# Altium PCB Relay Board.PcbDoc
Units mil, origin at the board's own origin, x right, y up, seen from the top; angles counter-clockwise.
Board outline 8250 x 5750 mil, 2 copper layers (Top, Bottom Layer), stack 92.212 mil thick; 12 components, 19 nets, 62 pads, 34 vias.
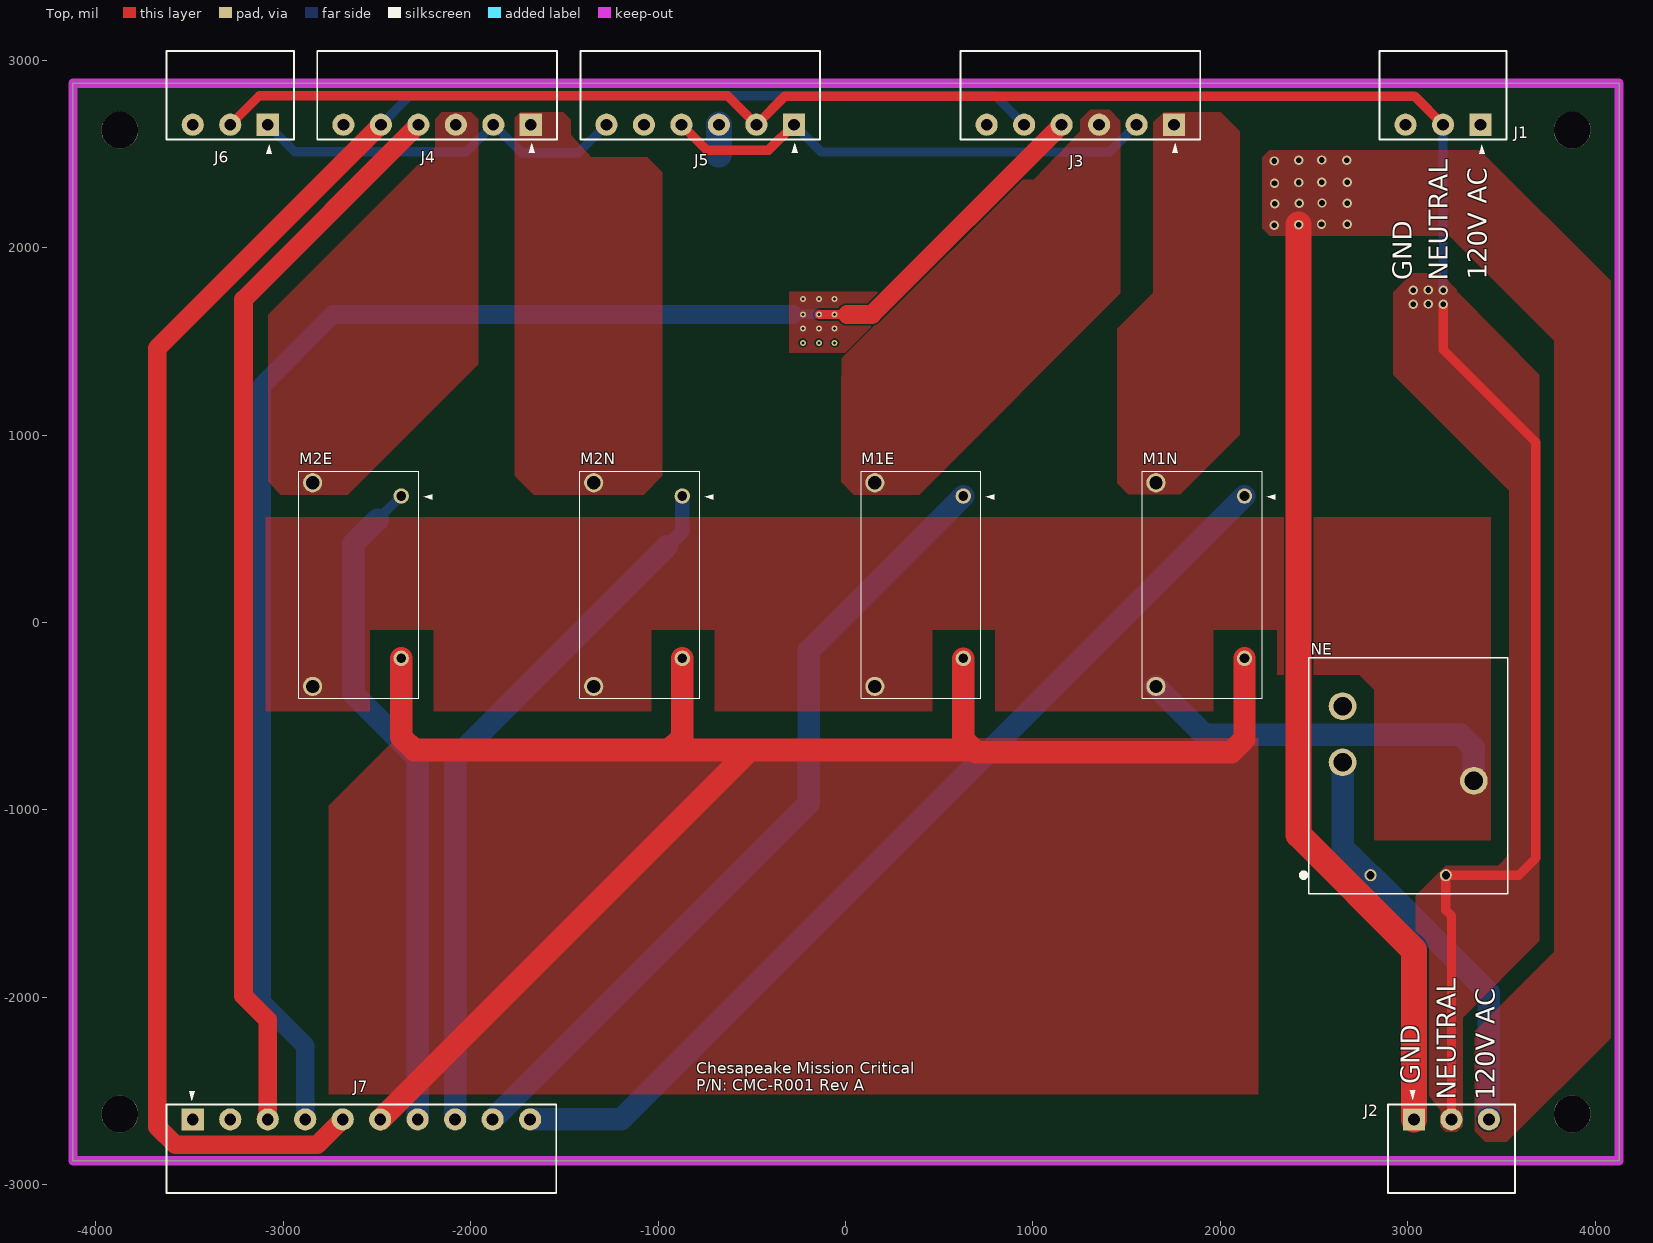
[diagram p0: Top view]
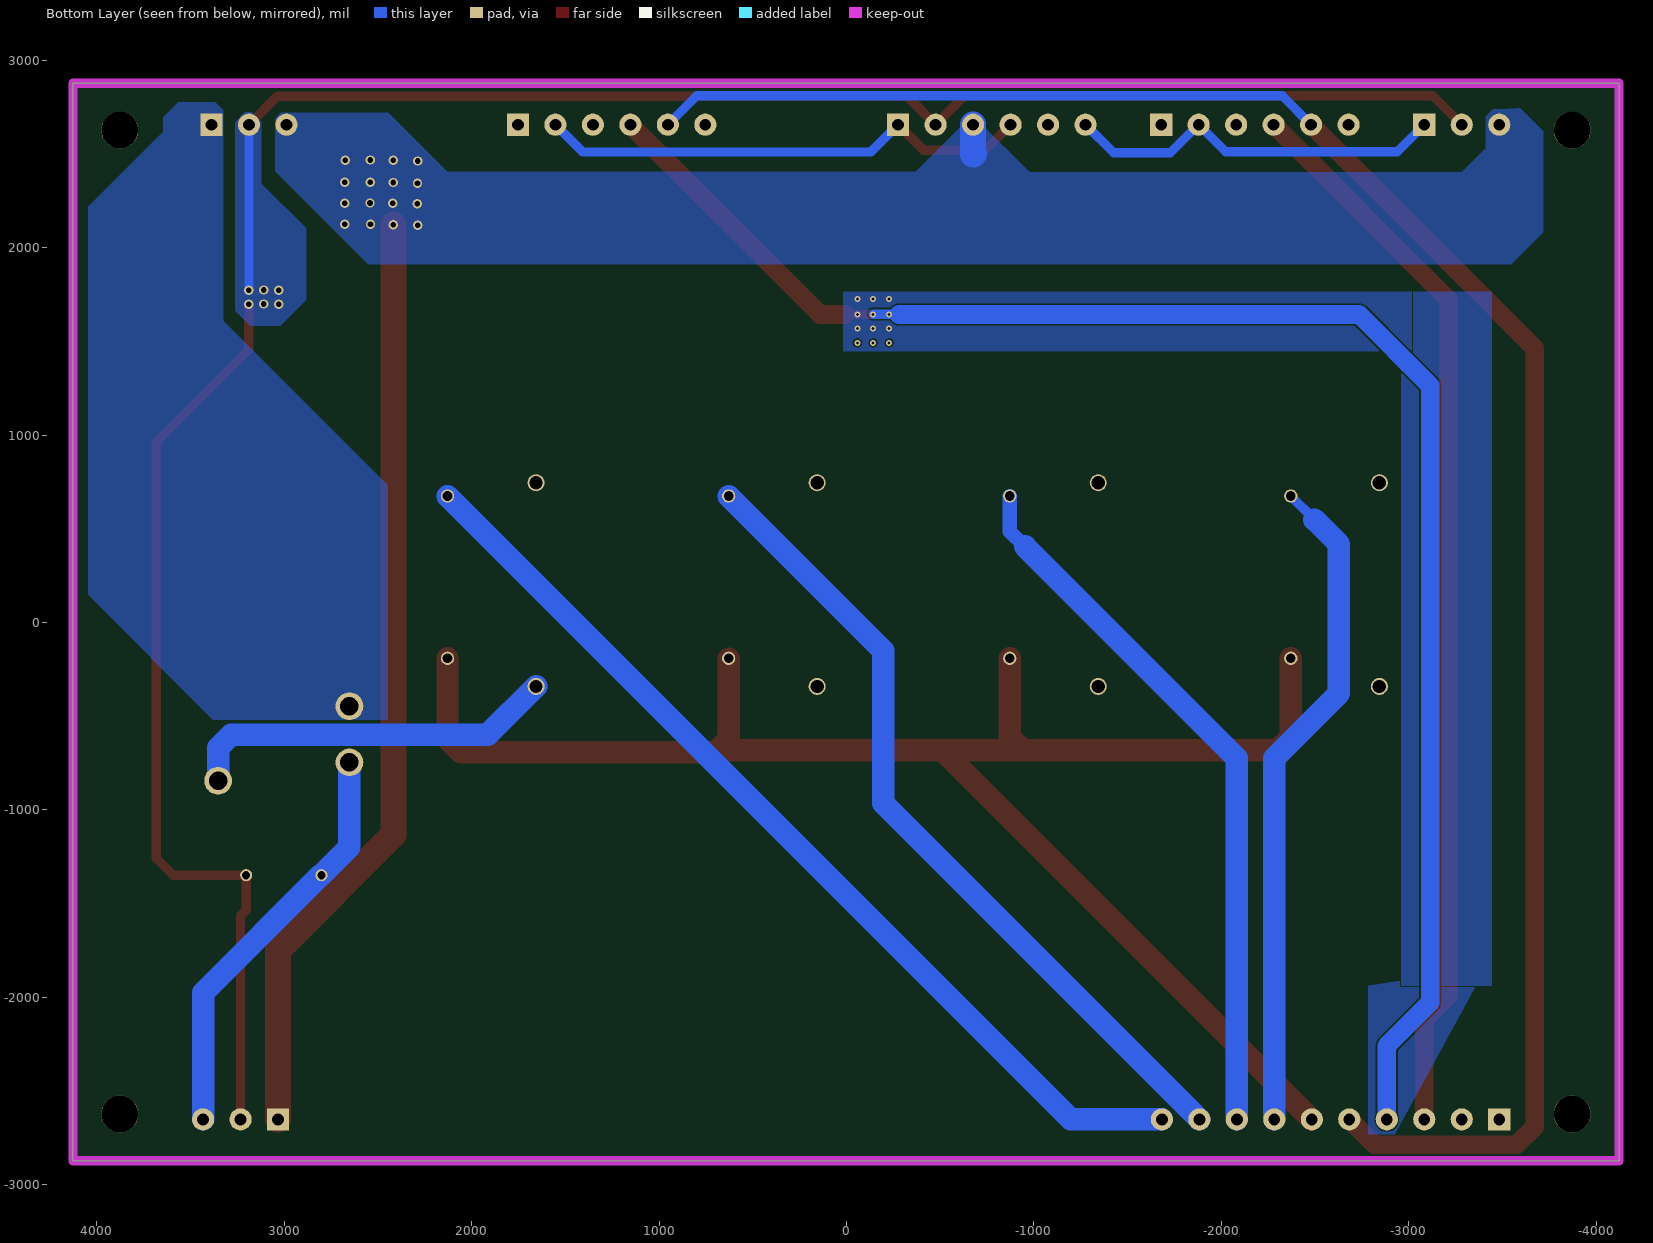
[diagram p1: Bottom Layer view, seen from below]
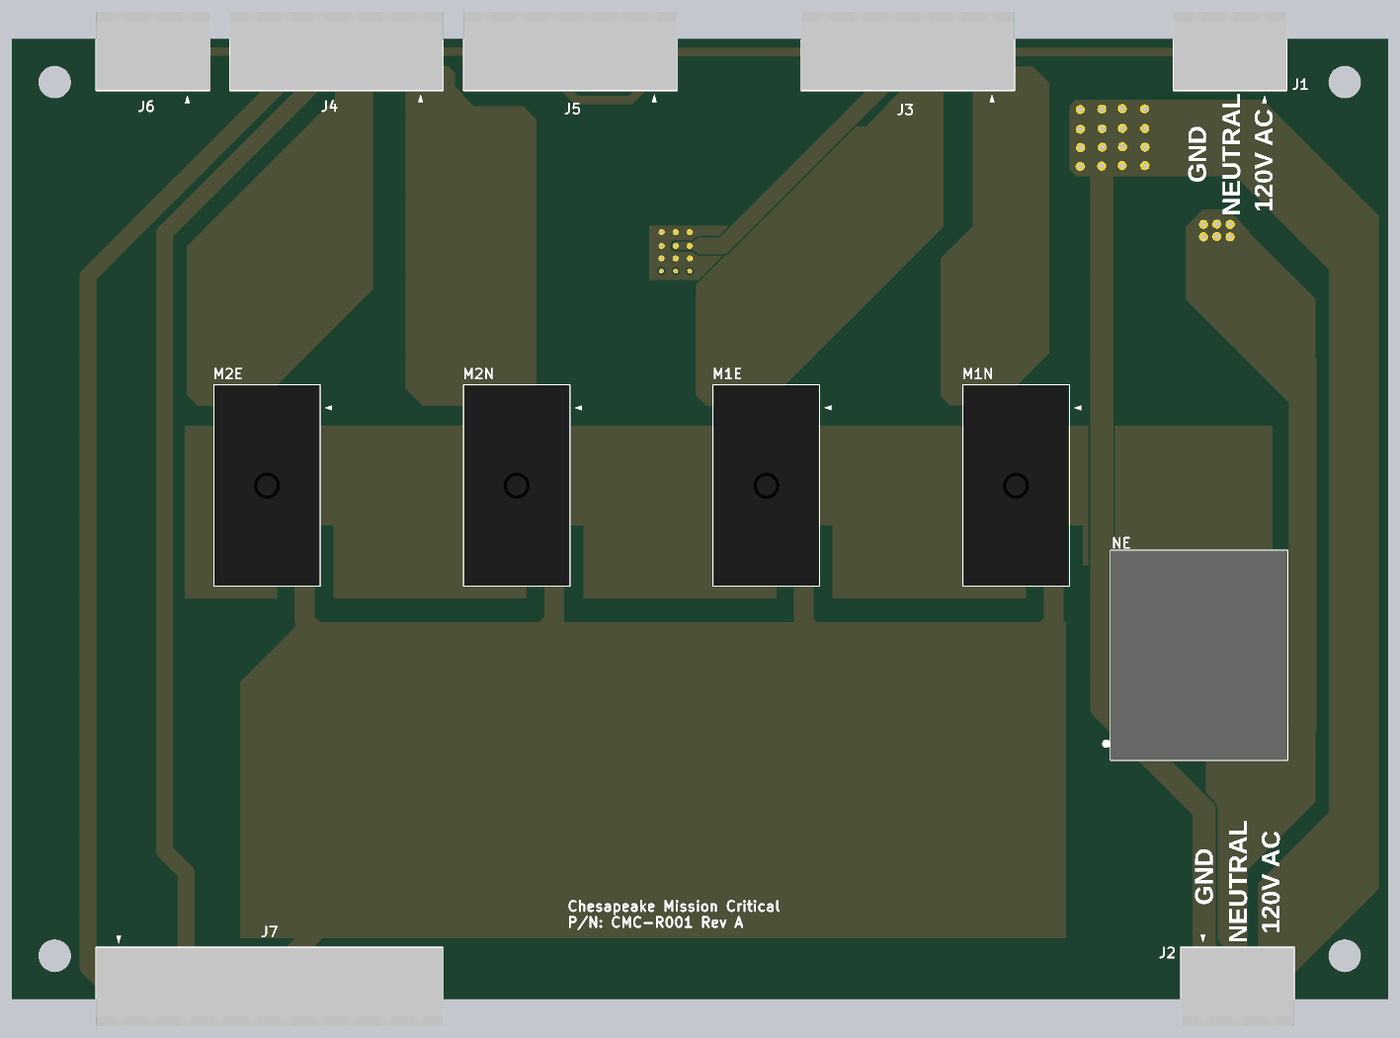
[diagram p2: 3D render of the assembled board from above, using the file's embedded part models]

## Layer stack, top to bottom
Solder Mask Top: solder mask 0.394, Solder Resist, Dk 3.5
Top: signal copper 4.1339
Dielectric: dielectric 83.944, FR-4, Dk 4.2
Bottom Layer: signal copper 4.1339
Bottom Solder: solder mask 0.394, Solder Resist, Dk 3.5

## Board outline
-4122.24,-2872.32 -4122.24,-2434.82 -4122.24,-2457.32 -4122.24,2442.68 -4122.24,2440.18 -4122.24,2877.68 4127.76,2877.68 4127.76,2440.18 4127.76,-1937.32 4127.76,-2872.32

## Design rules (kind name [scope] priority, off if disabled: settings)
Clearance Clearance_Default [All] p1: gap=8 ignorepadtopadclearanceinfootprint=FALSE except(10: Track-Poly)
ComponentClearance "ComponentClearance - Default - DEFAULT" [All] p1: gap=0 collisioncheckmode=3 verticalgap=10 showdistances=FALSE
FanoutControl Fanout_SOIC [IsSOIC] p1: bgadir=Out bgaviamode=Centered fanoutstyle=Auto fanoutdirection=Alternating viagrid=1 // Fanout_SOIC (Default Rule)
FanoutControl Fanout_Small [(CompPinCount < 5)] p2: bgadir=Out bgaviamode=Centered fanoutstyle=Auto fanoutdirection=OutThenIn viagrid=1 // Fanout_Small (Default Rule)
FanoutControl Fanout_LCC [IsLCC] p3: bgadir=Out bgaviamode=Centered fanoutstyle=Auto fanoutdirection=Alternating viagrid=1 // Fanout_LCC (Default Rule)
FanoutControl Fanout_BGA [IsBGA] p4: bgadir=Out bgaviamode=Centered fanoutstyle=Auto fanoutdirection=Alternating viagrid=1 // Fanout_BGA (Default Rule)
Height [All] p1: minheight=0 maxheight=1181.1 prefheight=500
HoleSize [All] p1: absolutevalues=TRUE maxlimit=200 minlimit=1 maxpercent=80.000 minpercent=20.000
HoleToHoleClearance "HoleToHoleClearance - Default - DEFAULT" [All] p1: gap=12 allowstackedmicrovias=TRUE
Length "Default Length" [All] p1: maxlimit=50000 minlimit=0
MaxMinImpedance "Default Impedance" [All] p1: minimum=50.00 maximum=150.0
MinimumSolderMaskSliver [All] p1: minsoldermaskwidth=5
ParallelSegment "Default Parallel Segment Adjasent" [All] p1 off: limit=1000 gap=200
ParallelSegment "Default Parallel Segment Same Layer" [All] p2 off: limit=1000 gap=200
PlaneConnect "Default PlaneConnect" [All] p1: planeconnectstyle=Direct reliefexpansion=20 reliefentries=4 reliefconductorwidth=15 reliefairgap=10
PolygonConnect [All] p1: thpad.connectstyle=Direct thpad.reliefconductorwidth=10 thpad.reliefentries=4 thpad.polygonreliefangle="90 Angle" thpad.airgapwidth=10 smdpad.connectstyle=Relief smdpad.reliefconductorwidth=8 smdpad.reliefentries=4 smdpad.polygonreliefangle="90 Angle" smdpad.airgapwidth=8 via.connectstyle=Direct via.reliefconductorwidth=10 via.reliefentries=4 via.polygonreliefangle="90 Angle" via.airgapwidth=10
RoomDefinition "Relay Board" [InComponentClass('Relay Board')] p1 off: confinementstyle=ConfineIn formatcopy=TRUE lockcomponents=FALSE outline 3531,1248 13021,1248 13021,2098 3531,2098
RoutingLayers "RoutingLayers - Default - DEFAULT" [All] p1: top layer_v5=TRUE bottom layer_v5=TRUE
RoutingPriority "RoutingPriority - Default - DEFAULT" [All] p1: routingpriority=3
RoutingTopology "Default Routing Topology" [All] p1: topology=Shortest
RoutingVias "RoutingVias - Default - DEFAULT" [All] p1: holewidth=16 width=32 viastyle="Through Hole" minholewidth=9.84 minwidth=19.68 maxholewidth=16 maxwidth=32
SMDToCorner "SMDToCorner - Default - DEFAULT" [All] p1: distance=0
SilkToSilkClearance [All] p1: silktosilkclearance=4
SilkToSolderMaskClearance [IsPad] p1: minsilkscreentomaskgap=4 clearancetoexposedcopper=TRUE
SolderMaskExpansion "SolderMaskExpansion from CAM settings" [All] p1: expansion=2 istentingtop=FALSE
Width "Default Width" [All] p1: maxlimit=250 minlimit=6 preferedwidth=20 minimp=50.000000 maximp=50.000000 favimp=50.000000
15 further rules are at their usual default settings.

## Components (designator, comment, footprint, x,y, rotation, side; value= is the part's Value field where it differs from the comment)
J1 "0395321003" HDR1X3_MOLEX_TERMINAL 3527.76,2577.68 r180 top locked
J2 "0395321003" HDR1X3_MOLEX_TERMINAL 2894,-2572.32 r0 top locked
J3 "0395321006" HDR1X6_MOLEX_TERMINAL 1892.72,2577.68 r180 top locked
J4 "0395321006" HDR1X6_MOLEX_TERMINAL -1539.76,2577.68 r180 top locked
J5 "0395321006" HDR1X6_MOLEX_TERMINAL -136.02,2577.68 r180 top locked
J6 "0395321003" HDR1X3_MOLEX_TERMINAL -2943.5,2577.68 r180 top locked
J7 "0395321010" HDR1X10_MOLEX_TERMINAL -3622.24,-2572.32 r0 top locked
M1E "G6QE-1A DC24" RELAY_G6QE-1A_OMR 402.76,202.68 r0 top locked
M1N "G6QE-1A DC24" RELAY_G6QE-1A_OMR 1902.76,202.68 r0 top locked
M2E "G6QE-1A DC24" RELAY_G6QE-1A_OMR -2597.24,202.68 r0 top locked
M2N "G6QE-1A DC24" RELAY_G6QE-1A_OMR -1097.24,202.68 r0 top locked
NE "J115F21C120VACS" RELAY_J115F2 3002.76,-897.32 r0 top locked

## Footprints (in the part's own frame and the unit in brackets; to place one, negate y for a bottom-side part, rotate by r counter-clockwise, add the part's x,y. Pads: shape width x height; smd on the part's side, far side on the other; paste and mask are expansions set on the pad)
HDR1X3_MOLEX_TERMINAL [mm]
  rect 3x3 hole 1.6: 1(3.54,-2)
  round 3 hole 1.6: 2(8.62,-2) 3(13.7,-2)
  silkscreen extent 0,-12 17.24,1.96, body extent -0.01,-12 17.24,-0.06, height 8.38
HDR1X6_MOLEX_TERMINAL [mm]
  rect 3x3 hole 1.6: 1(3.54,-2)
  round 3 hole 1.6: 2(8.62,-2) 3(13.7,-2) 4(18.78,-2) 5(23.86,-2) 6(28.94,-2)
  silkscreen extent 0,-12 32.48,1.81, body extent -0.01,-12 32.48,-0.06, height 8.38
HDR1X10_MOLEX_TERMINAL [mm]
  rect 3x3 hole 1.6: 1(3.54,-2)
  round 3 hole 1.6: 2(8.62,-2) 3(13.7,-2) 4(18.78,-2) 5(23.86,-2) 6(28.94,-2) 7(34.02,-2) 8(39.1,-2) 9(44.18,-2) 10(49.26,-2)
  silkscreen extent 0,-12 52.8,1.81, body extent 0,-12 52.8,-0.06, height 8.38
RELAY_G6QE-1A_OMR [mm]
  round 2.1 / inner round 1.808 / far side round 1.808 hole 1.3 mask+0: 1(5.75,12) 2(5.75,-10)
  round 2.6 / inner round 2.308 / far side round 2.308 hole 1.8 mask+0: 3(-6.25,-13.8) 4(-6.25,13.8)
  silkscreen extent -8.13,-15.38 9.94,15.38, body extent -8,-15.25 8,15.25, height 20.5
RELAY_J115F2 [mm]
  round 1.65 hole 1.1: 1(-5.1,-11.45) 2(5.1,-11.45)
  round 3.75 hole 2.5: 3(8.9,1.35) 4(-8.9,3.85) 5(-8.9,11.45)
  silkscreen extent -14.42,-13.96 13.5,18.05, body extent -13.5,-13.95 13.5,18.05, height 27.95

## Part data
J1 J2 J6: library part MOLEX_0395321003, "TERM BLOCK HDR 3POS 90DEG 5.08MM", Manufacturer=Molex, Package=None, Supplier Part Number 1=WM7846-ND, Manufacturer Part Number=0395321003, Supplier 1=Digi-Key
J3 J4 J5: library part MOLEX_0395321006, "TERM BLOCK HDR 6POS 90DEG 5.08MM", Manufacturer=Molex, Package=None, Supplier Part Number 1=900-0395321006-ND, Manufacturer Part Number=0395321006, Supplier 1=Digi-Key
J7: library part MOLEX_0395321010, "TERM BLOCK HDR 10POS 5.08MM", Manufacturer=Molex, Package=None, Supplier Part Number 1=WM7851-ND, Manufacturer Part Number=0395321010, Supplier 1=Digi-Key
M1E M1N M2E M2N: "RELAY PWR PCB SPST-NO 32A 24VDC", Manufacturer=Omron, Supplier Part Number 1=653-G6QE-1ADC24, Copyright="Copyright (C) 2022 Ultra Librarian. All rights reserved.", Manufacturer Part Number="G6QE-1A DC24", Supplier 1=Mouser, Type=DEV
NE: "RELAY UL & TUV GEN PURP SPDT 40A", Manufacturer="CIT Relay and Switch", Supplier Part Number 1=2449-J115F21C120VACS-ND, Manufacturer Part Number=J115F21C120VACS, Supplier 1=Digi-Key, Type=DEV

## Free pads (board coordinates)
  round 196.85 hole 196.85 unplated: MH(-3872.24,-2622.32) MH(-3872.24,2627.68) MH(3877.76,-2622.32) MH(3877.76,2627.68)

## Via types
v1: diameter 50, hole 30, Top to Bottom Layer, 22 vias
v2: diameter 32, hole 16, Top to Bottom Layer, 12 vias

## Nets (pads, with @x,y where several pads share a name; then routed paths per layer and width w, separated by ;. In a path a pad name is that pad's centre, name@x,y a point inside that pad or via, vN(x,y) a via of type N, cw(c..) or ccw(c..) an arc to the next point about the centre after c; other vN are vias at no path point)
NetJ1_1: J1.1 NE.5
NetJ1_2: J1.2 J2.2 J5.2 J6.2 NE.2 | length 12601.8
  Top w50: J6.2 -3128.59,2810.7 -629.66,2810.7 J5.2 -322.63,2809.18 3035.63,2809.18 J1.2 ; v1(3188.76,1697.96) 3189.76,1696.96 3189.76,1455.68 3682.76,962.68 3682.76,-1257.32 3591.97,-1348.11 NE.2 3203.55,-1534.18 3233.37,-1564 J2.2
  Bottom Layer w50: v1@3188.39,1772.25 J1.2
  other v1: 3028.76,1697.96 3108.76,1699.88 3028.76,1772.62 3188.76,1772.62 3108.76,1774.54
NetJ1_3: J1.3 J2.1 J5.3 J6.3 | length 5205.5
  Top w140: v1(2417.93,2123.26) 2417.93,-1132.48 3033.37,-1747.93 J2.1
  Bottom Layer w50: J5.3 J5.3@-660.94,2656.42
  Bottom Layer w140: -675.39,2499.15 -677.78,2499.15 -679.16,2500.52 -675.39,2504.29 J5.3
  other v1: 2287.82,2120.49 2540.17,2125.45 2677.31,2125.45 2290.34,2234.05 2420.45,2236.82 2677.31,2237.75 2542.7,2239.01 2289.48,2345.08 2419.59,2347.86 2676.45,2348.79 2541.84,2350.05 2288.43,2463.16 2418.54,2465.93 2675.4,2466.86 2540.79,2468.12
NetJ2_3: J2.3 NE.1 NE.4 | length 2227.3
  Bottom Layer w120: NE.4 2652.37,-1198.5 NE.1 ; NE.1@2805.55,-1348.11 3433.37,-1975.93 J2.3
NetJ3_1: J3.1 M1N.4
NetJ3_2: J3.2 J5.1 J5.4 | length 2661.4
  Top w50: J5.4 -740.14,2521.18 -410.63,2521.18 J5.1
  Bottom Layer w50: J5.1 -129.84,2510.87 1407.8,2510.87 J3.2
NetJ3_3: J3.3 M1E.4
NetJ3_4: J3.4 J7.4 | length 8852.3
  Top w50: v2@-139,1644 8.95,1644
  Top w100: 8.95,1644 140.93,1644 J3.4
  Bottom Layer w50: -278,1646 v2@-141,1646
  Bottom Layer w100: J7.4 -2882.87,-2259.13 -3115,-2027 -3115,1264 -2735,1644 -280,1644
  other v2: -227,1568 -142.23,1568 -57.46,1568 -227,1644 -142.23,1644 -57.46,1644 -227,1726 -142.23,1726 -57.46,1726
NetJ3_5: J3.5 J4.5 J7.5 | length 10486.4
  Top w100: J7.5 -2818.81,-2787 -3575,-2787 -3672,-2690 -3672,1463.55 J4.5
  Bottom Layer w50: J4.5 -2324.85,2810.7 799.08,2810.7 J3.5
NetJ4_1: J4.1 M2N.4
NetJ4_2: J4.2 J5.6 J6.1 | length 2049.4
  Bottom Layer w50: J6.1 -2938.76,2512.31 -2023.24,2512.31 J4.2 ; J4.2@-1877.42,2656.42 -1727.47,2506.47 -1425.34,2506.47 J5.6
NetJ4_3: J4.3 M2E.4
NetJ4_4: J4.4 J7.3 | length 5747.4
  Top w50: -3084,-2120 -3082.87,-2121.13
  Top w100: -3084,-2120 -3212,-1992 -3212,1723.55 J4.4 ; J7.3 -3082.87,-2121.13
NetJ7_6: J7.6 M1E.2 M1N.2 M2E.2 M2N.2 | length 9229.3
  Top w120: J7.6@-2480.98,-2651.06 -510.24,-680.32 ; M2E.2 -2370.86,-610.03 -2300.57,-680.32 -941.15,-680.32 ; M2N.2 -870.86,-610.03 -941.15,-680.32 ; M1E.2@627.28,-192.88 627.28,-621.03 686.57,-680.32 ; M1N.2 2129.14,-621.03 2058.85,-691.32 697.57,-691.32 686.57,-680.32 ; -941.15,-680.32 -510.24,-680.32 ; -510.24,-680.32 686.57,-680.32
NetJ7_7: J7.7 M2E.1 | length 3575.3
  Bottom Layer w50: -2496.49,549.49 M2E.1
  Bottom Layer w120: -2496.49,549.49 -2627.63,418.35 -2627.63,-378.37 -2282.87,-723.13 J7.7
NetJ7_8: J7.8 M2N.1 | length 3827.5
  Bottom Layer w75: -952,405 -870.86,486.14 M2N.1
  Bottom Layer w120: J7.8@-2082,-2650.19 -2082,-723.08 -952.96,405.96
NetJ7_9: J7.9 M1E.1 | length 4366.7
  Bottom Layer w120: J7.9 -197.24,-965.43 -197.24,-151.26 M1E.1
NetJ7_10: J7.10 M1N.1 | length 5189.8
  Bottom Layer w120: J7.10 -1197.04,-2651.06 M1N.1
NetM1E_3: M1E.3 M1N.3 M2E.3 M2N.3 NE.3 | length 2007.9
  Bottom Layer w120: M1N.3 1914.39,-598.32 3282.86,-598.32 3353.16,-668.61 NE.3
pads on no net: J3.6 J4.6 J5.5 J7.1 J7.2
copper on no net:
  other v2: -227,1492 -142.23,1492 -57.46,1492

## Polygon pours and split planes (outlines as drawn)
no net on Bottom Layer "NONET_L02_P018" (solid, pour order 18): -2785,-2730 -2925.2,-2730 -3413.93,-1835.68 -2785,-1937.32
no net on Bottom Layer "NONET_L02_P017" (solid, pour order 17): -3443,1765 -3443,-1937.32 -2960.5,-1937.32 -2960.5,1765
NetJ3_4 on Bottom Layer "NETJ3_4_L02_P016" (solid, pour order 16): 16.54,1765 -3017,1765 -3017,1448 16.54,1448
NetJ1_1 on Bottom Layer "NETJ1_1_L02_P000" (solid, pour order 0): 3325.97,2732.35 3325.98,1610.18 2448.09,732.29 2448.09,-517.32 3381.44,-517.32 4045.97,147.22 4045.97,2217.68 3645.98,2617.68 3645.98,2695.66 3565.98,2775.66 3368.83,2775.66
NetJ1_2 on Bottom Layer "NETJ1_2_L02_P010" (solid, pour order 10): 3122.76,2671.09 3174.36,2722.68 3210.15,2722.68 3262.76,2670.07 3262.76,1662.68 3182.76,1582.68 3022.76,1582.68 2882.76,1722.68 2882.76,2102.68 3122.76,2342.68
NetJ1_3 on Bottom Layer "NETJ1_3_L02_P007" (solid, pour order 7): -3482.87,2739.39 -3449.42,2739.39 -3409.79,2699.77 -3409.79,2530.3 -3281.55,2402.06 -976.61,2402.06 -705.06,2673.61 -636.16,2673.61 -368.8,2406.24 2131.64,2406.24 2446.2,2720.8 3017.73,2720.8 3047.45,2691.09 3047.45,2407.36 2553.15,1913.07 -3547.62,1913.07 -3717.24,2082.68 -3717.24,2622.68 -3596.25,2743.67 -3572.59,2743.67
NetJ3_4 on Top "NETJ3_4_L01_P015" (solid, pour order 15): -301,1765 187,1765 187,1440 -301,1440
NetJ3_3 on Top "NETJ3_3_L01_P004" (solid, pour order 4): -19.2,1317.98 -19.2,1410.86 932.61,2362.68 1005.61,2362.68 1253.26,2622.68 1253.26,2683.33 1305.93,2736 1409.44,2736 1467.31,2678.13 1467.31,1757.31 392.9,682.9 43.54,682.9 -23.91,750.35 -23.91,1313.28
NetJ1_2 on Top "NETJ1_2_L01_P011" (solid, pour order 11): 3262.76,1768.54 3262.76,1776.17 3176.26,1862.68 3022.76,1862.68 3022.76,1861.97 2922.76,1761.97 2922.76,1322.68 3542.76,702.68 3542.76,-1237.32 3482.76,-1297.32 3202.76,-1297.32 3042.76,-1457.32 3042.76,-2437.32 3176.26,-2604.19 3176.26,-2690.81 3202.76,-2717.32 3262.76,-2717.32 3292.43,-2687.65 3292.43,-2107.65 3702.76,-1697.32 3702.76,1323.17
NetM1E_3 on Top "NETM1E_3_L01_P002" (solid, pour order 2): 2302.76,-277.32 2302.76,-37.32 1962.76,-37.32 1962.76,-474.25 798.2,-474.25 798.2,-37.32 463.04,-37.32 463.04,-474.25 -697.24,-474.25 -697.24,-37.32 -1037.24,-37.32 -1037.24,-474.25 -2197.24,-474.25 -2197.24,-37.32 -2537.24,-37.32 -2537.24,-474.25 -3092.22,-474.25 -3092.22,562.68 3442.76,562.68 3442.76,-1161.02 2822.76,-1161.02 2822.76,-357.32 2742.76,-277.32
NetJ3_1 on Top "NETJ3_1_L01_P003" (solid, pour order 3): 1642.76,1760.71 1449.71,1567.65 1449.71,743.22 1507.81,685.12 1785.2,685.12 2102.76,1002.68 2102.76,2622.68 2002.77,2722.68 1697.65,2722.68 1642.76,2669.91
NetJ7_6 on Top "NETJ7_6_L01_P009" (solid, pour order 9): -2757.24,-2517.32 -2757.24,-977.32 -2397.24,-617.32 2202.76,-617.32 2202.76,-2517.32
NetJ4_3 on Top "NETJ4_3_L01_P006" (solid, pour order 6): -3079.73,1642.68 -2190.14,2532.27 -2190.14,2686.55 -2154.01,2722.68 -1996.85,2722.68 -1960.72,2686.55 -1960.72,1592.25 -1960.72,1379.2 -2657.02,682.9 -3012.29,682.9 -3079.73,750.34
NetJ1_3 on Top "NETJ1_3_L01_P008" (solid, pour order 8): 3414.76,-2771 3358.9,-2713.69 3358.9,-2181.18 3782.76,-1757.32 3782.76,1502.68 3222.76,2062.68 2262.76,2062.68 2222.76,2102.68 2222.76,2482.68 2261.26,2521.17 3384.26,2521.17 4082.41,1823.03 4082.41,-2217.67 3529.08,-2771
NetJ4_1 on Top "NETJ4_1_L01_P005" (solid, pour order 5): -977.24,2402.68 -1057.24,2482.68 -1357.24,2482.68 -1467.26,2602.68 -1467.26,2682.85 -1507.09,2722.68 -1735.36,2722.68 -1763.44,2694.6 -1763.44,1640.71 -1763.44,782.19 -1664.15,682.9 -1077.02,682.9 -977.24,782.68

## Keep-outs
Keep-Out Layer:
  lines w50: -4122.24,-2457.32 -4122.24,2442.68 ; -4122.24,-2434.82 -4122.24,-2872.32 4127.76,-2872.32 4127.76,-1937.32 4127.76,2440.18 4127.76,2877.68 -4122.24,2877.68 -4122.24,2440.18

## Other copper
Top:
  text "TOP LAYER" at -452.45,-4315.01 h200
Bottom Layer:
  text "BOTTOM LAYER" at -638.67,-4319.46 h200

## Silkscreen, mask and mechanical layers (free items; w line width, h text height)
Silkscreen Top:
  text "120V AC" at 3456,1830.23 h175 r90
  text "GND" at 3057,1827 h175 r90
  text "NEUTRAL" at 3248.95,1824 h175 r90
  text "GND" at 3098,-2464 h175 r90
  text "Chesapeake Mission Critical / P/N: CMC-R001 Rev A" at -797.24,-2497.32 h60
  text "NEUTRAL" at 3289.95,-2546 h175 r90
  text "120V AC" at 3499,-2548.77 h175 r90
  text "SILKSCREEN TOP" at -680.44,-4699.04 h200
Bottom Overlay:
  text "SILKSCREEN BOTTOM" at 1102.76,-4694.98 h200
Paste Mask Top:
  text "PASTEMASK TOP" at -665.56,-4887.48 h200
Paste Mask Bottom:
  text "PASTEMASK BOTTOM" at -877.24,-4874.98 h200
Solder Mask Top:
  text "SOLDERMASK TOP" at -734.98,-5075.92 h200
Bottom Solder:
  text "SOLDERMASK BOTTOM" at -935.52,-5075.92 h200
Drill Guide:
  text "DRILL GUIDE" at -517.24,-3934.98 h200
Board Shape:
  lines w10: -97.24,2.68 102.76,2.68 ; 2.76,-97.32 2.76,102.68
  lines w20: -4122.24,2440.18 -4122.24,2877.68 4127.76,2877.68 4127.76,1942.68 ; -4122.24,2442.68 -4122.24,-2434.82 -4122.24,-2872.32 4127.76,-2872.32 4127.76,-2434.82 ; 4127.76,-2437.32 4127.76,1940.18
  text "BOARD OUTLINE" at -663.94,-4137.24 h200
Top Assembly:
  lines w10: -97.24,2.68 102.76,2.68 ; 2.76,-97.32 2.76,102.68
  lines w20: -4122.24,2440.18 -4122.24,2877.68 4127.76,2877.68 4127.76,1942.68 ; -4122.24,2442.68 -4122.24,-2434.82 -4122.24,-2872.32 4127.76,-2872.32 4127.76,-2434.82 ; 4127.76,-2437.32 4127.76,1940.18
  text "ASSEMBLY TOP" at -630.85,-4515.56 h200
Bottom Assembly:
  text "ASSEMBLY BOTTOM" at 962.76,-4514.98 h200
Drill Drawing:
  drawing of 263 lines, arcs and shapes, not listed
  text "1" at -4649.23,6643.37 h300
  text "2" at 839.4,6643.37 h300
  text "3" at 6239.38,6643.37 h300
  text "4" at 11782.55,6643.37 h300
  text "REVISIONS" at 10230.4,6324.15 h75
  text "ZONE" at 7217.11,6069.15 h75
  text "LTR" at 7726.42,6069.15 h75
  text "DATE" at 12557.1,6069.15 h75
  text "APPROVED" at 13353.46,6069.15 h75
  text "DESCRIPTION" at 9650.28,6066.78 h75
  text "D" at -7185.59,4918.37 h300
  text "D" at 14339.37,4843.37 h300
  text "NOTES: UNLESS OTHERWISE SPECIFIED" at 7468.98,4837.84 h82.5
  text "1. FABRICATE PER IPC-6012A CLASS 2. / 2. FOR BOARD THICKNESS AND IMPEDANCE DETAILS REFER STACKUP DOCUMENT. / 3. PRINTED WIRING BOARD SHALL COMPLY WITH REQUIREMENTS OF ANSI/J-STD-003. / 4. PLATING FINISH: ENIG (ELECTROLESS NICKEL IMMERSION GOLD - ROHS) / 5. SOLDERMASK ON BOTH SIDES OF THE BOARD SHALL BE LPI, COLOR GREEN. / 6. SILK SCREEN LEGEND TO BE APPLIED PER LAYER STACKUP USING WHITE NON-CONDUCTIVE EPOXY INK. / 7. THIS PRINTED WIRING BOARD IS DESIGNED WITH A MINIMUM CONDUCTOR WIDTH AND SPACING OF 4 MIL & 4 MILS. / 8. ALL VIAS ARE TENTED ON BOTH SIDES UNLESS SOLDERMASK OPENED IN GERBER. / 9. ALL VIAS ON PAD SHOULD BE FILLED WITH NON CONDUCTIVE EPOXY AND SURFACE SHOULD BE FLAT. FLATNESS TOLERANCE FOR VIA ON PADS: +0.000 /- 0.001 INCHES ON BOTH SIDES. THE MANUFACTURER IS REQUESTED TO SIZE PER THEIR SOLDERMASK TOLERANCE. / 10. SOLDER MASK OPENING IS KEPT SAME SIZE AS PAD (1:1) FOR ALL COMPONENTS / 11. VENDOR SHOULD FOLLOW ROHS COMPLIANT PROCESS AND Pb FREE FOR MANUFACTURING / 12. MANUFACTURER'S IDENTIFICATION, DATECODE LETTER SHALL BE SILKSCREENED ON SOLDER SIDE OF THE BOARD. / 13. TRACE WIDTH SHOULD BE ACCURATELY ETCHED. MAX TOLERANCE +/- 1 MIL / 14. ALL DIMENSIONS ARE IN INCHES UNLESS OTHERWISE SPECIFIED. / 15. FLATNESS REQUIREMENTS: / A. BOW AND TWIST OF ASSEMBLY SUB-PANEL OR SINGULATED PWB SHALL NOT EXCEED 0.7% OF LONGEST SIDE / B. TEST IN ACCORDANCE WITH THE CURRENT REVISION OF IPC-TM-650 2.4.22 / 16. PCB MATERIAL REQUIREMENTS: / A. FLAMMABILITY RATING MUST MEET OR EXCEED UL94V-0 REQUIREMENTS. PCB MUST BEAR THE UL94V-0 REGISTERED MATERIAL ID NUMBER. / B. Tg 180 CELSIUS OR EQUIVALENT. / C. EQUIVALENT MATERIAL SHALL BE RoHS COMPLIANT, HALOGEN FREE AND APPROVED BY CHESAPEAKE MISSION CRITICAL. / 17. LAYER TO LAYER REGISTRATION SHALL BE WITHIN +/-2 MIL" at 7462.76,942.68 h82.5
  text "C" at 14332.55,943.38 h300
  text "C" at -7192.4,718.38 h300
  text "Layer" at 7712.51,-87.35 h100
  text "Name" at 8145.68,-87.35 h100
  text "Material" at 9055.43,-87.35 h100
  text "Thickness" at 9823.27,-87.35 h100
  text "Constant" at 10454.56,-87.35 h100
  text "Board Layer Stack" at 11036.96,-87.35 h100
  text "Silkscreen Top" at 8145.68,-287.35 h100
  text "Solder Mask Top" at 8145.68,-487.35 h100
  text "Solder Resist" at 9055.43,-487.35 h100
  text "0.010mm" at 9823.27,-487.35 h100
  text "3.5" at 10454.56,-487.35 h100
  text "REV." at 14256,-487.29 h53.45 r90
  text "1" at 7712.51,-687.35 h100
  text "Top" at 8145.68,-687.35 h100
  text "0.105mm" at 9823.27,-687.35 h100
  text "Dielectric" at 8145.68,-887.35 h100
  text "FR-4" at 9055.43,-887.35 h100
  text "2.132mm" at 9823.27,-887.35 h100
  text "4.2" at 10454.56,-887.35 h100
  text "2" at 7712.51,-1087.35 h100
  text "Bottom Layer" at 8145.68,-1087.35 h100
  text "0.105mm" at 9823.27,-1087.35 h100
  text "Bottom Solder" at 8145.68,-1287.35 h100
  text "Solder Resist" at 9055.43,-1287.35 h100
  text "0.010mm" at 9823.27,-1287.35 h100
  text "3.5" at 10454.56,-1287.35 h100
  text "Total board thickness:" at 7712.51,-1487.35 h100
  text "2.362mm" at 9823.27,-1487.35 h100
  text "Symbol" at 7630.27,-1597.19 h120
  text "Count" at 8131.57,-1597.19 h120
  text "Hole Size" at 8585.36,-1597.19 h120
  text "Plated" at 9568.82,-1597.19 h120
  text "Hole Type" at 10001.03,-1597.19 h120
  text "Drill Layer Pair" at 10626.57,-1597.19 h120
  text "Via/Pad" at 11570.51,-1597.19 h120
  text "12" at 8131.57,-1804.83 h100
  text "16.00mil (0.406mm)" at 8585.36,-1804.83 h100
  text "PTH" at 9568.82,-1804.83 h100
  text "Round" at 10001.03,-1804.83 h100
  text "Top - Bottom Layer" at 10626.57,-1804.83 h100
  text "Via" at 11570.51,-1804.83 h100
  text "22" at 8131.57,-2012.48 h100
  text "30.00mil (0.762mm)" at 8585.36,-2012.48 h100
  text "PTH" at 9568.82,-2012.48 h100
  text "Round" at 10001.03,-2012.48 h100
  text "Top - Bottom Layer" at 10626.57,-2012.48 h100
  text "Via" at 11570.51,-2012.48 h100
  text "2" at 8131.57,-2220.12 h100
  text "43.31mil (1.100mm)" at 8585.36,-2220.12 h100
  text "PTH" at 9568.82,-2220.12 h100
  text "Round" at 10001.03,-2220.12 h100
  text "Top - Bottom Layer" at 10626.57,-2220.12 h100
  text "Pad" at 11570.51,-2220.12 h100
  text "8" at 8131.57,-2427.77 h100
  text "51.18mil (1.300mm)" at 8585.36,-2427.77 h100
  text "PTH" at 9568.82,-2427.77 h100
  text "Round" at 10001.03,-2427.77 h100
  text "Top - Bottom Layer" at 10626.57,-2427.77 h100
  text "Pad" at 11570.51,-2427.77 h100
  text "37" at 8131.57,-2635.41 h100
  text "62.99mil (1.600mm)" at 8585.36,-2635.41 h100
  text "PTH" at 9568.82,-2635.41 h100
  text "Round" at 10001.03,-2635.41 h100
  text "Top - Bottom Layer" at 10626.57,-2635.41 h100
  text "Pad" at 11570.51,-2635.41 h100
  text "8" at 8131.57,-2843.05 h100
  text "70.87mil (1.800mm)" at 8585.36,-2843.05 h100
  text "PTH" at 9568.82,-2843.05 h100
  text "Round" at 10001.03,-2843.05 h100
  text "Top - Bottom Layer" at 10626.57,-2843.05 h100
  text "Pad" at 11570.51,-2843.05 h100
  text "DWG NO." at 14256,-3038.7 h53.45 r90
  text "3" at 8131.57,-3050.7 h100
  text "98.43mil (2.500mm)" at 8585.36,-3050.7 h100
  text "PTH" at 9568.82,-3050.7 h100
  text "Round" at 10001.03,-3050.7 h100
  text "Top - Bottom Layer" at 10626.57,-3050.7 h100
  text "Pad" at 11570.51,-3050.7 h100
  text "4" at 8131.57,-3258.34 h100
  text "196.85mil (5.000mm)" at 8585.36,-3258.34 h100
  text "NPTH" at 9568.82,-3258.34 h100
  text "Round" at 10001.03,-3258.34 h100
  text "Top - Bottom Layer" at 10626.57,-3258.34 h100
  text "Pad" at 11570.51,-3258.34 h100
  text "96 Total" at 8131.57,-3465.99 h100
  text "B" at -7185.59,-3481.62 h300
  text "CAGE CODE" at 14256,-3961.88 h53.45 r90
  text "SIZE" at 14256,-4532.16 h53.45 r90
  text "No SILKSCREEN BOTTOM/PASTEMASK TOP/BOTTOM" at -2037.24,-5277.32 h200
  text "PROJECTION" at 7304.38,-6459.11 h60
  text "APPROVALS" at 5025.75,-6693.72 h187.5
  text "XXXXX" at 10398.98,-6797.16 h175
  text "DATE:" at 6392.11,-6954.11 h60
  text "DRN BY:" at 4498.03,-6969.11 h60
  text "UNLESS OTHERWISE SPECIFIED" at 7529.38,-6969.11 h60
  text "A.A" at 5189.11,-7070.23 h90
  text "XX/XX/XX" at 6633.98,-7082.16 h75
  text "DIMENSIONS ARE IN INCHES" at 7592.11,-7089.11 h60
  text "TITLE" at 9488.58,-7160.82 h75
  text "CHK:" at 4503.48,-7269.11 h60
  text "2 PLC" at 8103.47,-7284.11 h60
  text "3 PLC" at 8538.47,-7284.11 h60
  text "ANGLES" at 9000.74,-7284.11 h60
  text "FABRICATION DRAWING" at 10274.45,-7417.55 h150
  text "TOLERANCES" at 7328.93,-7449.11 h60
  text "+" at 8132.11,-7509.11 h60
  text "+" at 8567.11,-7509.11 h60
  text "APPD:" at 4515.75,-7569.11 h60
  text "-.01" at 8126.65,-7569.11 h60
  text "-.005" at 8576.65,-7569.11 h60
  text "2" at 9157.56,-7569.11 h60
  text "A" at -7199.23,-7681.61 h300
  text "MATERIAL:" at 7318.02,-7794.11 h60
  text "XXXXX" at 10279.45,-7797.55 h150
  text "A" at 14325.73,-7831.61 h300
  text "APPD:" at 4530.75,-7869.11 h60
  text "SIZE" at 9539.38,-8135.82 h75
  text "CAGE CODE" at 10059.26,-8135.82 h75
  text "DWG NO." at 10976.31,-8135.82 h75
  text "REV." at 13747.55,-8150.82 h75
  text "PROJ MGR:" at 4511.66,-8169.1 h60
  text "XXXXX" at 11594.45,-8462.55 h150
  text "B" at 9593.92,-8464.41 h150
  text "FINISH:" at 7315.29,-8484.1 h60
  text "A" at 13827.45,-8508.55 h150
  text "PROD REL DATE:" at 4521.21,-8544.1 h60
  text "SCALE" at 9489.61,-8780.82 h75
  text "ENGRG MGR:" at 4746.21,-8784.1 h60
  text "SHEET" at 12598.01,-8795.82 h75
  text "DO NOT SCALE DWG" at 11124.6,-8870.82 h75
  text "NONE" at 10187.11,-8879.26 h105
  text "1 OF 1" at 13309.82,-8882.54 h90
  text "1" at -4574.23,-9556.6 h300
  text "2" at 764.4,-9556.6 h300
  text "3" at 6314.38,-9556.6 h300
  text "4" at 11707.56,-9556.6 h300

## Dimensions
4127.76,-2872.32 to 4127.76,2877.68 on Top Assembly
-4122.24,-2872.32 to 4127.76,-2872.32 on Top Assembly
-3622.24,-3044.76 to -4122.24,-2872.32 on Top Assembly
2894,-3044.76 to -1543.5,-3044.76 on Top Assembly
3572.74,-3044.76 to 4127.76,-2872.32 on Top Assembly
3527.76,3050.12 to 4127.76,2877.68 on Top Assembly
1892.72,3050.12 to 2849.02,3050.12 on Top Assembly
-136.02,3050.12 to 613.98,3050.12 on Top Assembly
-1539.76,3050.12 to -1414.76,3050.12 on Top Assembly
-2943.5,3050.12 to -2818.5,3050.12 on Top Assembly
-3622.24,3050.12 to -4122.24,2877.68 on Top Assembly

## Text inside footprints (layer, text, board x,y; h text height)
J1: Top Assembly "1" at 3396.26,2656.42 h40 r180; Top Assembly "3" at 2988.39,2655.95 h40 r180
J2: Top Assembly "1" at 3025.51,-2651.06 h40; Top Assembly "3" at 3433.37,-2650.59 h40
J3: Top Assembly "1" at 1763.35,2671.42 h40 r180; Top Assembly "6" at 763.35,2670.95 h40 r180
J4: Top Assembly "6" at -2669.13,2670.95 h40 r180; Top Assembly "1" at -1669.13,2671.42 h40 r180
J5: Top Assembly "6" at -1265.39,2670.95 h40 r180; Top Assembly "1" at -265.39,2671.42 h40 r180
J6: Top Assembly "3" at -3482.87,2655.95 h40 r180; Top Assembly "1" at -3075,2656.42 h40 r180
J7: Top Assembly "1" at -3492.87,-2666.06 h40; Top Assembly "10" at -1699.93,-2664.02 h40